# Altium PCB Stadium_Board.PcbDoc
Units mil, origin at the board's own origin, x right, y up, seen from the top; angles counter-clockwise.
Board outline 3450 x 1800 mil, 2 copper layers (Top Layer, Bottom Layer); 52 components, 36 nets, 158 pads, 57 vias.
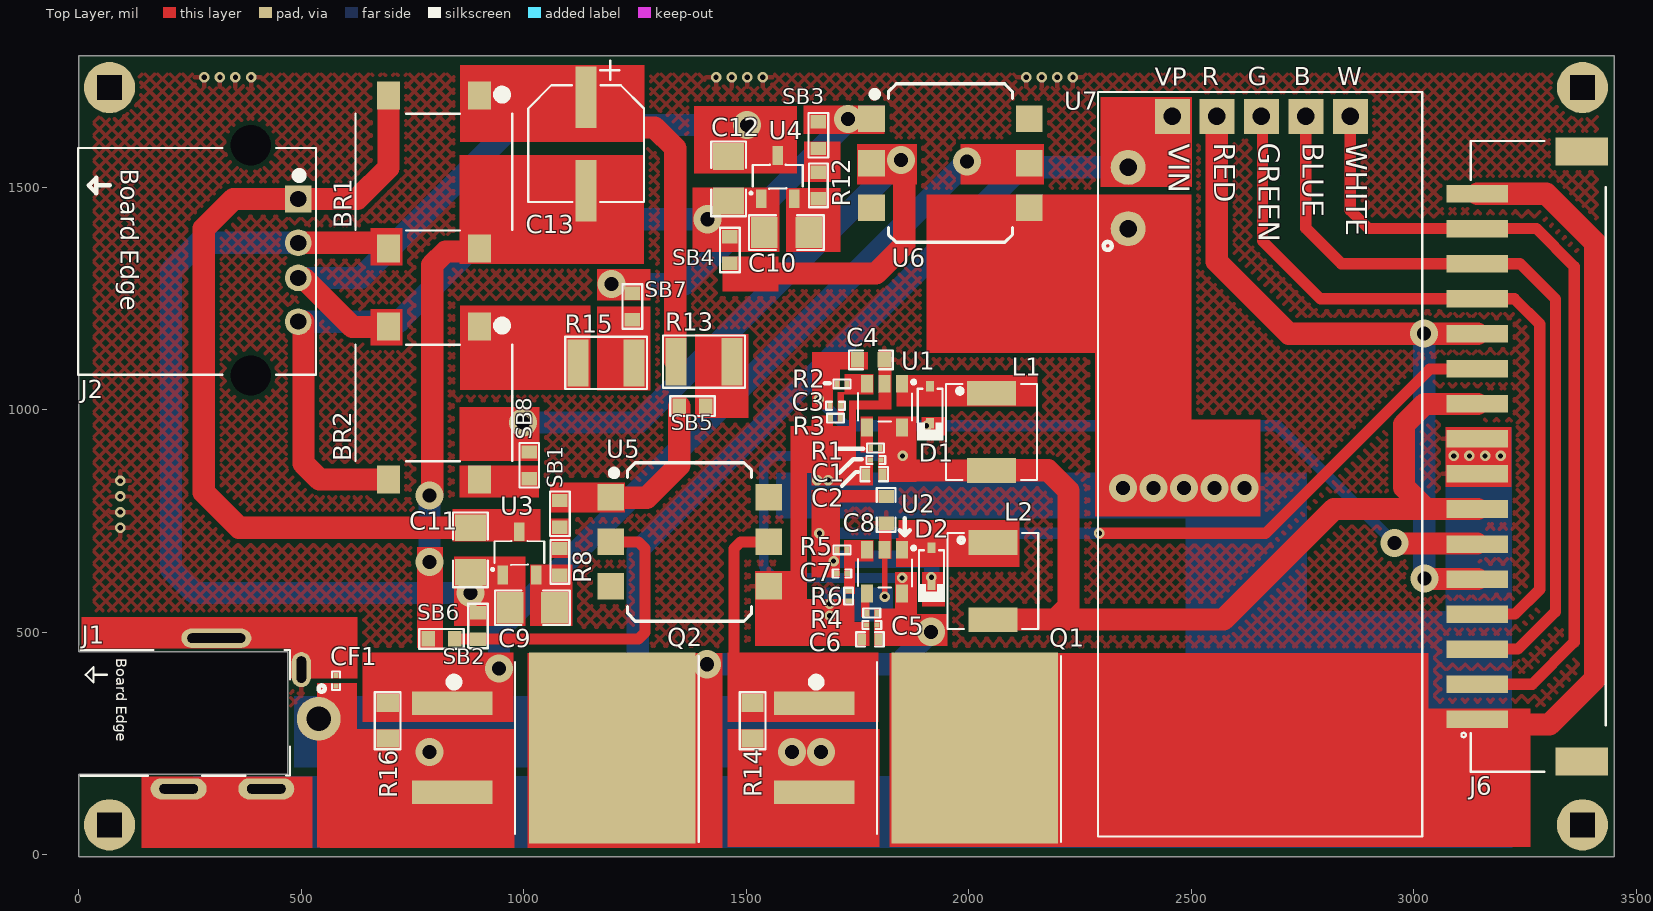
[diagram p0: Top Layer view]
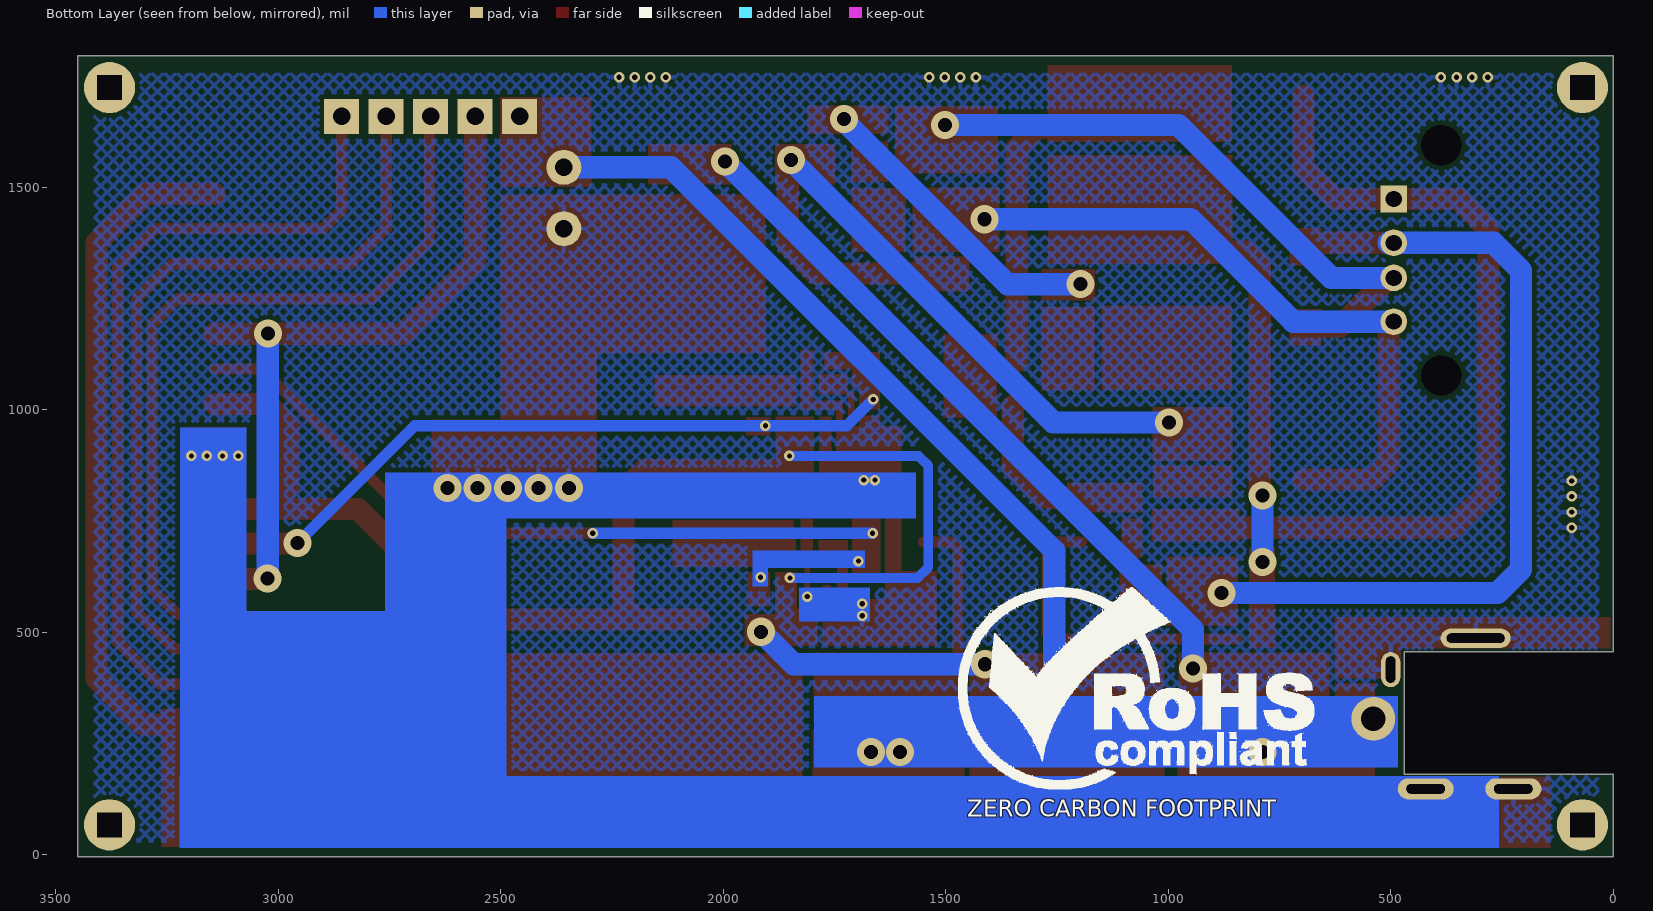
[diagram p1: Bottom Layer view, seen from below]
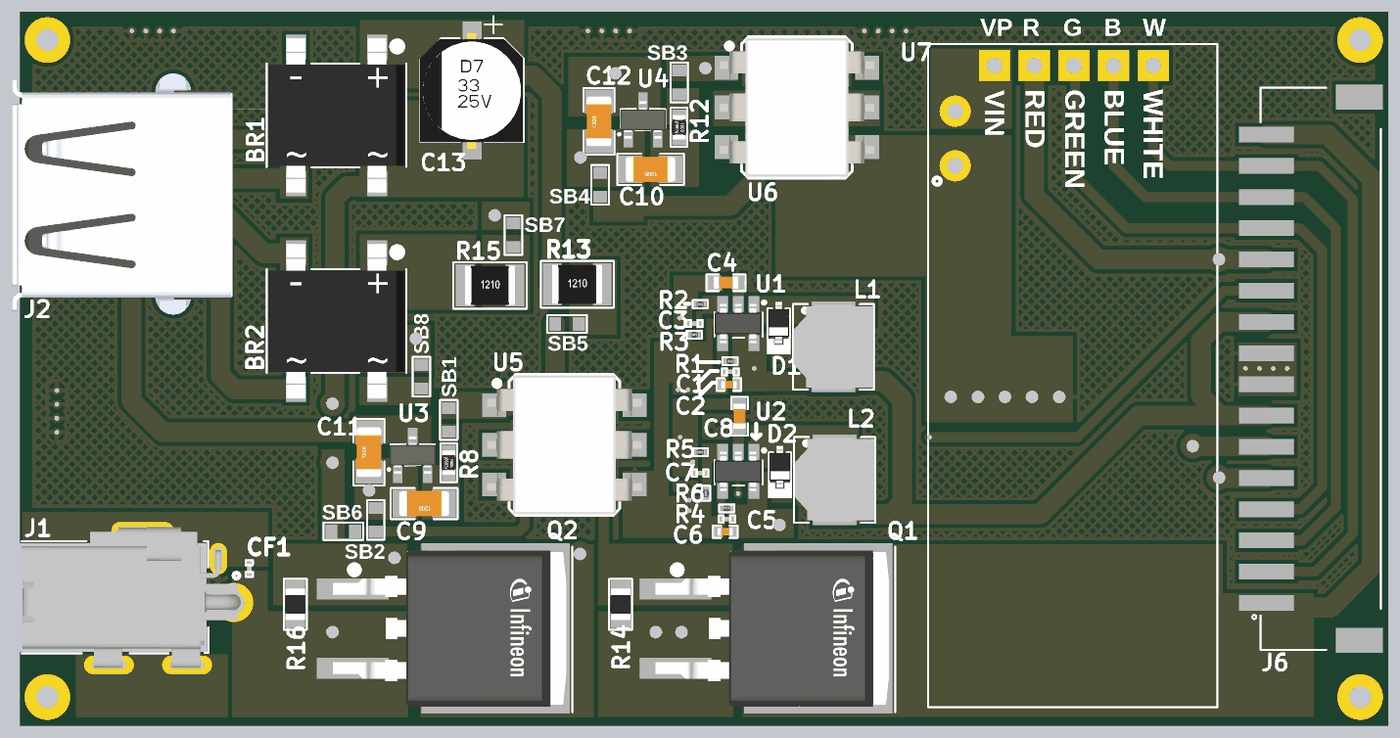
[diagram p2: 3D render of the assembled board from above, using the file's embedded part models]

## Layer stack, top to bottom
Top Solder: solder mask 0.4, Solder Resist, Dk 3.5
Top Layer: signal copper 1.4
Dielectric 1: dielectric 12.6, FR-4, Dk 4.8
Bottom Layer: signal copper 1.4
Bottom Solder: solder mask 0.4, Solder Resist, Dk 3.5

## Board outline
0,-5 0,181 470,181 470,456 0,456 0,1795 3450,1795 3450,-5

## Design rules (kind name [scope] priority, off if disabled: settings)
Clearance [All] p1: gap=10 ignorepadtopadclearanceinfootprint=FALSE except(0: Arc-Hole Track-Hole SMDPad-Hole THPad-Hole Via-Hole Fill-Hole Poly-Hole Region-Hole Text-Hole)
ComponentClearance [All] p1: gap=0 collisioncheckmode=3 verticalgap=0 showdistances=FALSE
HoleSize [All] p1: absolutevalues=TRUE maxlimit=1000 minlimit=1 maxpercent=80.000 minpercent=20.000
HoleToHoleClearance [All] p1: gap=0 allowstackedmicrovias=TRUE
MinimumSolderMaskSliver [All] p1: minsoldermaskwidth=0
PolygonConnect [All] p1: connectstyle=Relief reliefconductorwidth=10 reliefentries=4 polygonreliefangle="90 Angle" airgapwidth=10
RoutingVias [All] p1: holewidth=11.81 width=23.62 viastyle="Through Hole" minholewidth=7.87 minwidth=15.75 maxholewidth=31.5 maxwidth=62.99
SilkToSilkClearance [All] p1: silktosilkclearance=0
SilkToSolderMaskClearance [IsPad] p1: minsilkscreentomaskgap=0 clearancetoexposedcopper=TRUE
SolderMaskExpansion SolderMaskExpansion_1 [Not IsVia] p1: expansion=4 istentingtop=FALSE
SolderMaskExpansion [IsVia] p2: expansion=4 istentingtop=FALSE soldermaskfromhole=TRUE
Width [All] p1: maxlimit=50 minlimit=10 preferedwidth=12 minimp=50.000000 maximp=50.000000 favimp=50.000000
24 further rules are at their usual default settings.

## Classes and differential pairs
component class U_Rectifier_Section: BR1 BR2 C13 Q1 Q2 R13 R14 R15 R16 SB5 SB6 SB7 SB8 U5 U6
component class U_Regulator_Section: C9 C10 C11 C12 R8 R12 SB1 SB2 SB3 SB4 U3 U4
component class U_Boost_Section: C1 C2 C3 C4 C5 C6 C7 C8 D1 D2 L1 L2 R1 R2 R3 R4 R5 R6 U1 U2
component class U_Connector_Section: CF1 J1 J2 J6 U7

## Components (designator, comment, footprint, x,y, rotation, side; value= is the part's Value field where it differs from the comment)
BR1 "DF06S" DF06S 798,1534 r180 top locked
BR2 "DF06S" DF06S 798,1015 r180 top locked
C1 "0.1uF" "CAP 0201" 1791,887 r180 top locked
C2 "2.2uF" Cap0402 1787.5,855 r180 top locked
C3 "220pF" "CAP 0201" 1700,1009 r0 top locked
C4 "4.7uF" Cap0603 1780,1112 r0 top locked
C5 "0.1uF" "CAP 0201" 1782,516 r180 top locked
C6 "2.2uF" Cap0402 1778,484 r180 top locked
C7 "220pF" "CAP 0201" 1715,632 r0 top locked
C8 "4.7uF" Cap0603 1814,775 r270 top locked
C9 "1uF" Cap1206 1019,555 r180 top locked value=1206
C10 "1uF" Cap1206 1590,1398 r180 top locked value=1206
C11 "1uF" Cap1206 880,685 r90 top locked value=1206
C12 "1uF" Cap1206 1460,1519 r90 top locked value=1206
C13 "33uF" VE-330M1ETR-0605 1140,1597 r270 top locked
CF1 "0.1uF" "CAP 0201" 578,391 r90 top
D1 "SDM2U20SD3-7" SDM2U20SD3-7 1913,1011 r270 top locked
D2 "SDM2U20SD3-7" SDM2U20SD3-7 1916,648 r270 top locked
J1 "DC-C024E-7A-1.65" DC-C024E-7A-1.65 381.69,317.3 r0 top locked
J2 "292303-1" 292303-1 493,1473.43 r270 top
J6 "0220164-162121" 0220164-162121 3260,895 r90 top locked
L1 "10uH" SPM5012T-100M-LR 2051,950 r270 top locked
L2 "10uH" SPM5012T-100M-LR 2054,615 r270 top locked
Q1 "IPB120P04P4L03ATMA2" IPB120P04P4L03ATMA2 1832.88,240 r270 top locked
Q2 "IPB120P04P4L03ATMA2" IPB120P04P4L03ATMA2 1018.88,240 r270 top locked
R1 "51K" Res-0201 1790.17,914 r180 top locked
R2 "715K" Res-0201 1715,1058 r180 top locked
R3 "13K" Res-0201 1700.17,981 r180 top locked
R4 "51K" Res-0201 1782,543 r180 top locked
R5 "715K" Res-0201 1715,685 r180 top locked
R6 "13K" Res-0201 1730,581 r270 top locked
R8 "220R" Res0603 1081,658 r90 top locked
R12 "220R" Res0603 1662,1504 r90 top locked
R13 "560R" "RES 1210" 1405,1108 r0 top locked
R14 "10K" "RES 0805" 1514,301 r90 top locked value=10kO
R15 "560R" "RES 1210" 1185,1105 r0 top locked
R16 "10K" "RES 0805" 694,301 r90 top locked value=10kO
SB1 "Solder Bridge" "Solder Bridge" 1081,766 r90 top locked
SB2 "Solder Bridge" "Solder Bridge" 897,514 r270 top locked
SB3 "Solder Bridge" "Solder Bridge" 1662,1617 r90 top locked
SB4 "Solder Bridge" "Solder Bridge" 1463,1359 r270 top locked
SB5 "Solder Bridge" "Solder Bridge" 1379,1008 r180 top locked
SB6 "Solder Bridge" "Solder Bridge" 815,485 r0 top locked
SB7 "Solder Bridge" "Solder Bridge" 1244,1232 r90 top locked
SB8 "Solder Bridge" "Solder Bridge" 1012,875 r90 top locked
U1 "LMR62014XMF/NOPB" SOT23-5 1811,1009 r270 top locked
U2 "LMR62014XMF/NOPB" SOT23-5 1811,636 r270 top locked
U3 "SE8633X2-HF" SOT23-3 990,675 r90 top locked
U4 "SE8633X2-HF" SOT23-3 1570.6,1520.62 r90 top locked
U5 "4N25SM" 4N25/35M 1372.64,703 r0 top locked
U6 "4N25SM" 4N25/35M 1958.64,1554 r0 top locked
U7 "ESP8285" ESP8285 2857.21,1659.17 r180 top locked

## Footprints (in the part's own frame and the unit in brackets; to place one, negate y for a bottom-side part, rotate by r counter-clockwise, add the part's x,y. Pads: shape width x height; smd on the part's side, far side on the other; paste and mask are expansions set on the pad)
4N25/35M [mm] "OPTOISO 4.17KV TRANS W/BASE 6SMD"
  rect 1.52x1.525 smd: 1(-4.505,2.54) 2(-4.505,0) 3(-4.505,-2.54) 4(4.505,-2.54) 5(4.505,0) 6(4.505,2.54)
  silkscreen extent -4.42,-4.52 3.54,4.52, body extent -4.95,-4.44 4.95,4.44, height 5.08
0220164-162121 [mm]
  rect 1x3.5 smd: 1(-15,2.975) 2(-13,2.975) 3(-11,2.975) 4(-9,2.975) 5(-7,2.975) 6(-5,2.975) 7(-3,2.975) 8(-1,2.975) 9(1,2.975) 10(3,2.975) 11(5,2.975) 12(7,2.975) 13(9,2.975) 14(11,2.975) 15(13,2.975) 16(15,2.975)
  rect 1.6x3 smd: MP1(-17.4,-2.975) MP2(17.4,-2.975)
  silkscreen extent -18,-4.35 18,3.89
292303-1 [mm] "USB-A (USB TYPE-A) USB 2.0 Receptacle Connector 4 Position Through Hole, Right Angle"
  rect 1.524x1.524 hole 0.92: 1(0,0)
  round 1.524 hole 0.92: 2(2.5,0) 3(4.5,0) 4(7,0)
  round 0 hole 2.3 unplated: MH1(-3.07,-2.71) MH2(10.07,-2.71)
  silkscreen extent -2.92,-12.57 10.03,1.02, body extent -4.44,-13.02 11.56,0.98, height 7.71
Cap0402 [mil]
  rect 18x25 smd mask+2.36: 1(-18.5,0) 2(18.5,0)
  silkscreen extent -31,-16 31,16, body extent -20,-10 20,10, height 19
Cap0603 [mil]
  rect 30x35 smd mask+2.36: 1(-30,0) 2(30,0)
  silkscreen extent -49,-21 49,21, body extent -32,-16 31,16, height 34
Cap1206 [mil] "SMD 1206"
  rect 60x70 smd: 1(-50,0) 2(50,0)
  silkscreen extent -84,-39 84,39, body extent -63,-31 63,32, height 39
"CAP 0201" [mm]
  rect 0.3x0.3 smd mask+0.055: 1(-0.3,0) 2(0.3,0)
  silkscreen extent -0.53,-0.23 0.53,0.23, body extent -0.3,-0.15 0.3,0.15, height 0.28
DC-C024E-7A-1.65 [mm]
  round 2.5 hole 1.4: 1(3.995,-0.3)
  oval 4x1.1 hole 0.55 slot 3.3 at 0 deg: 2(-1.845,4.3)
  oval 1.1x2 hole 0.55 slot 1.5 at 90 deg: 3(3.005,2.507)
  oval 3.2x1.2 hole 0.55 slot 2.2 at 0 deg: 4(-3.995,-4.3) 5(1.005,-4.3)
  silkscreen extent -9.6,-3.56 4.35,3.63, body extent -9.57,-4.48 4.43,4.52, height 5.05
DF06S [mm]
  rect 1.3x1.6 smd: 1(-2.6,-4.37) 2(-2.6,4.37) 3(2.6,-4.37) 4(2.6,4.37)
  silkscreen extent -4.47,-4.68 4.47,3.33, body extent -4.4,-4.98 4.4,4.99, height 3.02
ESP8285 [mm]
  round 2 hole 1: 1(12.68,6.41) 2(12.68,2.91)
  rect 2x2 hole 1: 3(10.16,0) 4(7.62,0) 5(5.08,0) 6(2.54,0) 7(0,0)
  silkscreen extent -4.1,-1.4 14.4,41.1
IPB120P04P4L03ATMA2 [mm] "MOSFET P-CH 40V 120A TO263-3"
  rect 1.35x4.6 smd: 1(-2.54,-4.575) 3(2.54,-4.575)
  rect 10.9x9.5 smd: 2_4(0,4.575)
  silkscreen extent -5.23,-4.7 5.36,9.5, body extent -5,-5.85 5,9.1, height 4.51
Res0603 [mil]
  rect 30x35 smd: 1(-30,0) 2(30,0)
  silkscreen extent -49,-21 49,21, body extent -31,-17 31,17, height 18
"RES 0805" [mil] "SMD 0805"
  rect 40x50 smd: 1(-40,0) 2(40,0)
  silkscreen extent -64,-29 64,29, body extent -39,-25 39,24, height 24
"RES 1210" [mm] "560 OHM"
  rect 1.2x2.7 smd: 1(-1.6,0) 2(1.6,0)
  silkscreen extent -2.34,-1.49 2.34,1.49, body extent -1.6,-1.25 1.6,1.25, height 0.6
Res-0201 [mm]
  rect 0.27x0.37 smd: 1(-0.275,0) 2(0.275,0)
  silkscreen extent -0.48,-0.25 0.48,0.25, body extent -0.3,-0.15 0.3,0.15, height 0.29
SDM2U20SD3-7 [mm]
  rect 0.59x0.45 smd: 1(-1.055,0) 2(1.055,0)
  silkscreen extent -0.91,-0.76 2.03,0.76, body extent -1.3,-0.68 1.3,0.67, height 1.1
"Solder Bridge" [mil] "Solder Bridge ON"
  rect 30x35 smd: 1(-30,0) 2(30,0)
  silkscreen extent -50,-22 50,22
SOT23-3 [mm]
  rect 1.07x0.6 smd: 1(-1.184,0.95) 2(-1.184,-0.95) 3(1.286,0)
  silkscreen extent -0.94,-1.42 0.76,1.6, body extent -1.15,-1.46 1.25,1.46, height 1.19
SOT23-5 [mil] "SOT23-5 Package"
  rect 40x27 smd: 1(-49.21,39.37) 2(-49.21,0) 3(-49.21,-39.37) 4(49.21,-39.37) 5(49.21,39.37)
  silkscreen extent -56,-60 36,68, body extent -49,-59 49,59, height 43
SPM5012T-100M-LR [mm]
  rect 1.4x2.8 smd: 1(-2.2,0) 2(2.2,0)
  silkscreen extent -2.74,-2.59 2.74,2.59, body extent -2.7,-2.55 2.7,2.55, height 1.16
VE-330M1ETR-0605 [mm]
  rect 3.5x1.2 smd: 1(-2.67,0) 2(2.67,0)
  silkscreen extent -4.75,-3.3 3.3,3.3, body extent -3.67,-3.33 3.73,3.27, height 5.25

## Part data
BR1 BR2: "BRIDGE RECT 1PHASE 600V 1A DF-S", Average Rectified Current=1.5A, Capacitance=1nF, Case/Package=SMD/SMT, Case Code (Imperial)=0603, Case Code (Metric)=1608, Forward Voltage=1.1V, Manufacturer="ON Semiconductor / Fairchild", Max Forward Surge Current (Ifsm)=50A, Max Operating Temperature=150°C, Max Power Dissipation=3.1W, Max Repetitive Reverse Voltage (Vrrm)=600V, Max Reverse Leakage Current=50uA, Min Operating Temperature=-55°C, Package Quantity=10000, Peak Reverse Current=5uA, Supplier Part Number 1=DF06SCT-ND, Tolerance=5%, Voltage Rating=100V, ComponentLink1Description=http://www.farnell.com/datasheets/2161293.pdf?src-supplier=Element14, ComponentLink1URL=http://www.farnell.com/datasheets/2161293.pdf?src-supplier=Element14, ComponentLink2Description=https://www.fairchildsemi.com/datasheets/DF/DF08S.pdf?src-supplier=Avnet, ComponentLink2URL=https://www.fairchildsemi.com/datasheets/DF/DF08S.pdf?src-supplier=Avnet, ComponentLink3Description=http://www.fairchildsemi.com/ds/DF/DF08S.pdf?src-supplier=Avnet+Europe, ComponentLink3URL=http://www.fairchildsemi.com/ds/DF/DF08S.pdf?src-supplier=Avnet+Europe, ComponentLink4Description=http://www.fairchildsemi.com/ds/DF/DF06S.pdf?src-supplier=Future+Electronics, ComponentLink4URL=http://www.fairchildsemi.com/ds/DF/DF06S.pdf?src-supplier=Future+Electronics, ComponentLink5Description=https://www.fairchildsemi.com/datasheets/DF/DF005S.pdf?src-supplier=Digi-Key, ComponentLink5URL=https://www.fairchildsemi.com/datasheets/DF/DF005S.pdf?src-supplier=Digi-Key, ComponentLink6Description=http://www.mouser.com/ds/2/149/DF06S-190284.pdf?src-supplier=Mouser, ComponentLink6URL=http://www.mouser.com/ds/2/149/DF06S-190284.pdf?src-supplier=Mouser, ComponentLink7Description=http://datasheet.iiic.cc/fairchild/DF06S.pdf?src-supplier=IIIC, ComponentLink7URL=http://datasheet.iiic.cc/fairchild/DF06S.pdf?src-supplier=IIIC, Current Rating=1.5A, Element Configuration=Single, Forward Current=1.5A, Height=3.3mm, Lead Free="Lead Free", Length=0.063inch, Manufacturer Part Number=DF06S, Max Surge Current=50A, Mount="Through Hole", Number of Elements=1, Number of Pins=4, Output Current=1.5A, Packaging="Tape and Reel", Peak Non-Repetitive Surge Current=50A, Power Dissipation=3.1W, Pricing 1="1=0.5, 10=0.425, 25=0.3964, 100=0.2946, 500=0.23 (USD)", Radiation Hardening=No, REACH SVHC="No SVHC", Stock 1=3050, Supplier 1=Digi-Key, Termination=SMD/SMT, Thickness=0.035inch, Voltage Rating (DC)=600V, Weight=0.484g, Width=6.5mm
C1 C5: library part GRM033R61E104KE14D, "CAP CER 0.1UF 25V X5R 0201", Capacitance=100nF, Case/Package=0201, Case Code (Metric)=0603, Dielectric=X5R, Manufacturer=Murata, Max Operating Temperature=85°C, Min Operating Temperature=-55°C, Package Quantity=15000, Resistor Type=Ceramic, Supplier Part Number 1=81-GRM033R61E104KE4D, Tolerance=10%, Voltage Rating=25V, Case Code (Imperial)=0201, Category="Ceramic Capacitors", ComponentLink1Description=http://www.farnell.com/datasheets/2867843.pdf?src-supplier=Farnell, ComponentLink1URL=http://www.farnell.com/datasheets/2867843.pdf?src-supplier=Farnell, ComponentLink2Description=http://www.mouser.com/ds/2/281/c02e-2905.pdf?src-supplier=Mouser, ComponentLink2URL=http://www.mouser.com/ds/2/281/c02e-2905.pdf?src-supplier=Mouser, ComponentLink3Description=http://search.murata.co.jp/Ceramy/image/img/A01X/G101/ENG/GRM033R61E104KE14-01.pdf?src-supplier=Digi-Key, ComponentLink3URL=http://search.murata.co.jp/Ceramy/image/img/A01X/G101/ENG/GRM033R61E104KE14-01.pdf?src-supplier=Digi-Key, ComponentLink4Description=http://www.farnell.com/datasheets/2867843.pdf?src-supplier=Newark, ComponentLink4URL=http://www.farnell.com/datasheets/2867843.pdf?src-supplier=Newark, Height=0.3mm, Lead Free="Lead Free", Length=0.024inch, Manufacturer Part Number=GRM033R61E104KE14D, Mount="Surface Mount", Packaging="Tape and Reel", Pricing 1="1=0.12000, 10=0.05600, 50=0.05600, 100=0.02500, 1000=0.01400, 10000=0.01100 (USD)", RoHS=Yes, RoHS Compliant=Yes, Stock 1=19728, Supplier 1=Mouser, Termination=SMD/SMT, Thickness=0.013inch, Voltage Rating (DC)=25V, Weight=1.2E-05oz, Width=0.012inch
C2 C6: library part C1005X5R1E225KT000E, "CAP CER 2.2UF 25V X5R 0402", Case/Package=0402, Case Code (Metric)=1005, Dielectric=X5R, Dielectric Material=Ceramic, Manufacturer=TDK, Manufacturer Part Number=C1005X5R1E225K050BC, Max Operating Temperature=85°C, Min Operating Temperature=-55°C, Package Quantity=1, Supplier Part Number 1=445-9090-1-ND, Tolerance=10%, Voltage Rating=25V, Capacitance=2.2uF, Case Code (Imperial)=0402, Category="Ceramic Capacitors", ComponentLink1Description=https://datasheet.ciiva.com/24217/c1005x5r1e225k050bc-264404-24217075.pdf?src-supplier=Mouser, ComponentLink1URL=https://datasheet.ciiva.com/24217/c1005x5r1e225k050bc-264404-24217075.pdf?src-supplier=Mouser, ComponentLink2Description=https://datasheet.ciiva.com/6276/tdkmlcccaprange-6276808.pdf?src-supplier=Digi-Key, ComponentLink2URL=https://datasheet.ciiva.com/6276/tdkmlcccaprange-6276808.pdf?src-supplier=Digi-Key, ComponentLink3Description=https://datasheet.ciiva.com/6276/tdkmlcccaprange-6276806.pdf?src-supplier=Digi-Key, ComponentLink3URL=https://datasheet.ciiva.com/6276/tdkmlcccaprange-6276806.pdf?src-supplier=Digi-Key, ComponentLink4Description=https://datasheet.ciiva.com/6276/tdkmlcccaprange-6276810.pdf?src-supplier=Digi-Key, ComponentLink4URL=https://datasheet.ciiva.com/6276/tdkmlcccaprange-6276810.pdf?src-supplier=Digi-Key, Depth=0.5mm, Height=0.5mm, Lead Free="Lead Free", Length=1mm, Mount="Surface Mount", Packaging="Tape and Reel", Pricing 1="1=0.31000, 10=0.21000, 50=0.13980, 100=0.11890, 500=0.08390, 1000=0.07342, 2500=0.06992, 5000=0.06468 (USD)", REACH SVHC="No SVHC", Resistor Type=Ceramic, RoHS=Yes, RoHS Compliant=Yes, Series=C, Stock 1=655450, Supplier 1=Digi-Key, Termination=SMD/SMT, Thickness=0.022inch, Voltage Rating (DC)=25V, Weight=2.3E-05oz, Width=0.5mm
C3 C7: library part C0603X7R221KGT, "50V 220pF X7R ±10% 0201 Multilayer Ceramic Capacitors MLCC - SMD/SMT ROHS", Manufacturer="Darfon Elec", ComponentLink1Description="New link", ComponentLink1URL=https://www.lcsc.com/product-detail/Multilayer-Ceramic-Capacitors-MLCC-SMD-SMT_Darfon-Elec-C0603X7R221KGT_C258475.html, Manufacturer Part No=C0603X7R221KGT
C4 C8: library part C1608X5R1E475K080AC, "CAP CER 4.7UF 25V X5R 0603", Case/Package=0603, Case Code (Metric)=1608, Dielectric=X5R, Dielectric Material=Ceramic, Manufacturer=TDK, Max Operating Temperature=85°C, Min Operating Temperature=-55°C, Package Quantity=4000, Supplier Part Number 1=445-9050-1-ND, Tolerance=10%, Voltage Rating=25V, Capacitance=4.7uF, Case Code (Imperial)=0603, Category="Ceramic Capacitors", ComponentLink1Description=https://datasheet.ciiva.com/48587/6print-detail-pdf-phplangenpart-noc1608x5r1e475k080acimp-unit-xmhz-48587141.pdf?src-supplier=Onlinecomponents.com, ComponentLink1URL=https://datasheet.ciiva.com/48587/6print-detail-pdf-phplangenpart-noc1608x5r1e475k080acimp-unit-xmhz-48587141.pdf?src-supplier=Onlinecomponents.com, ComponentLink2Description=https://datasheet.ciiva.com/24216/mlcc-commercial-general-en-24216326.pdf?src-supplier=Mouser, ComponentLink2URL=https://datasheet.ciiva.com/24216/mlcc-commercial-general-en-24216326.pdf?src-supplier=Mouser, ComponentLink3Description=https://datasheet.ciiva.com/48671/mlcc-commercial-general-en-48671304.pdf?src-supplier=Avnet, ComponentLink3URL=https://datasheet.ciiva.com/48671/mlcc-commercial-general-en-48671304.pdf?src-supplier=Avnet, Depth=0.8mm, Height=0.8mm, Lead Free="Lead Free", Length=1.6mm, Manufacturer Part Number=C1608X5R1E475K080AC, Mount="Surface Mount", Packaging="Tape and Reel", Pricing 1="1=0.36000, 10=0.25000, 50=0.17460, 100=0.14970, 500=0.11230, 1000=0.09483 (USD)", REACH SVHC="No SVHC", Resistor Type=Ceramic, RoHS=Yes, Stock 1=495198, Supplier 1=Digi-Key, Termination=SMD/SMT, Thickness=0.039inch, Voltage Rating (DC)=25V, Weight=7.1E-05oz, Width=0.031inch
C9 C10 C11 C12: library part CL31B105KCHNNNE, "CAP CER 1UF 100V X7R 1206", Manufacturer="Samsung Electro-Mechanics", Package=1206, ComponentLink1Description="New link", ComponentLink1URL=https://lcsc.com/product-detail/Multilayer-Ceramic-Capacitors-MLCC-SMD-SMT_Samsung-Electro-Mechanics-CL31B105KCHNNNE_C13832.html, Manufacturer Part No=CL31B105KCHNNNE
C13: library part VE-330M1ETR-0605, "Aluminum Electrolytic Capacitors - SMD 25 Volts 33uF 20% 6.3x5.3", Case/Package=Aluminum, Leakage Current=3uA, Manufacturer=Lelon, Max Operating Temperature=85°C, Min Operating Temperature=-40°C, Package Quantity=1000, Ripple Current=67mA, Supplier Part Number 1=VE330M1ETR0605, Tolerance=20%, Voltage Rating=25V, Capacitance=33uF, Category="Aluminum Electrolytic Capacitors", ComponentLink1Description=https://www.verical.com/server-webapp/html/getDatasheet?partID=686789&src-supplier=Verical, ComponentLink1URL=https://www.verical.com/server-webapp/html/getDatasheet?partID=686789&src-supplier=Verical, ComponentLink2Description=http://components.arrow.com/part/dataview/0323_04207400?src-supplier=Arrow+Europe, ComponentLink2URL=http://components.arrow.com/part/dataview/0323_04207400?src-supplier=Arrow+Europe, ComponentLink3Description=http://www.lelon.com.tw/down.php?f=/file/7.pdf&n=VE.pdf&src-supplier=Mouser, ComponentLink3URL=http://www.lelon.com.tw/down.php?f=/file/7.pdf&n=VE.pdf&src-supplier=Mouser, Construction=Cylindrical, Dissipation Factor=0.14%, Height=6.6mm, Length=5.3mm, Life (Hours)=2000Hour, Manufacturer Part Number=VE-330M1ETR-0605, Packaging="Tape and Reel", Pricing 1="1000=0.14450, 2000=0.13080, 4000=0.10990, 5000=0.10190, 10000=0.09820, 25000=0.09440 (USD)", Radiation Hardening=No, RoHS=Yes, RoHS Compliant=Yes, Series=VE, Stock 1=3000, Supplier 1="Arrow Electronics", Termination=SMD/SMT, Voltage Rating (DC)=25V
CF1: library part GRM033R61E104KE14D, "CAP CER 0.1UF 25V X5R 0201", Capacitance=100nF, Case Code (Imperial)=0201, Case Code (Metric)=0603, Dielectric=X5R, Manufacturer=Murata, Max Operating Temperature=85°C, Min Operating Temperature=-55°C, Package Quantity=15000, Resistor Type=Ceramic, Supplier Part Number 1=81-GRM033R61E104KE4D, Tolerance=10%, Voltage Rating=25V, Case/Package=0201, Category="Ceramic Capacitors", ComponentLink1Description=http://www.farnell.com/datasheets/2867843.pdf?src-supplier=Farnell, ComponentLink1URL=http://www.farnell.com/datasheets/2867843.pdf?src-supplier=Farnell, ComponentLink2Description=http://www.mouser.com/ds/2/281/c02e-2905.pdf?src-supplier=Mouser, ComponentLink2URL=http://www.mouser.com/ds/2/281/c02e-2905.pdf?src-supplier=Mouser, ComponentLink3Description=http://search.murata.co.jp/Ceramy/image/img/A01X/G101/ENG/GRM033R61E104KE14-01.pdf?src-supplier=Digi-Key, ComponentLink3URL=http://search.murata.co.jp/Ceramy/image/img/A01X/G101/ENG/GRM033R61E104KE14-01.pdf?src-supplier=Digi-Key, ComponentLink4Description=http://www.farnell.com/datasheets/2867843.pdf?src-supplier=Newark, ComponentLink4URL=http://www.farnell.com/datasheets/2867843.pdf?src-supplier=Newark, Height=0.3mm, Lead Free="Lead Free", Length=0.024inch, Manufacturer Part Number=GRM033R61E104KE14D, Mount="Surface Mount", Packaging="Tape and Reel", Pricing 1="1=0.12000, 10=0.05600, 50=0.05600, 100=0.02500, 1000=0.01400, 10000=0.01100 (USD)", RoHS=Yes, RoHS Compliant=Yes, Stock 1=19728, Supplier 1=Mouser, Termination=SMD/SMT, Thickness=0.013inch, Voltage Rating (DC)=25V, Weight=1.2E-05oz, Width=0.012inch
D1 D2: "DIODE SCHOTTKY 20V 2A SOD323", Average Rectified Current=2A, Manufacturer=Diodes, Max Reverse Voltage (DC)=20V, Supplier Part Number 1=SDM2U20SD3-7DICT-ND, Category="Rectifier Diodes", ComponentLink1Description=http://www.mouser.com/ds/2/115/SDM2U20SD3-537776.pdf?src-supplier=Mouser, ComponentLink1URL=http://www.mouser.com/ds/2/115/SDM2U20SD3-537776.pdf?src-supplier=Mouser, ComponentLink2Description=https://www.diodes.com/assets/Datasheets/SDM2U20SD3.pdf?src-supplier=Digi-Key, ComponentLink2URL=https://www.diodes.com/assets/Datasheets/SDM2U20SD3.pdf?src-supplier=Digi-Key, ComponentLink3Description=http://diodes.com/datasheets/SDM2U20SD3.pdf?src-supplier=Avnet, ComponentLink3URL=http://diodes.com/datasheets/SDM2U20SD3.pdf?src-supplier=Avnet, Manufacturer Part Number=SDM2U20SD3-7, Mount="Surface Mount", Packaging="Cut Tape", Pricing 1="1=0.47000, 10=0.35200, 100=0.19930, 500=0.13200, 1000=0.10120 (USD)", RoHS=Yes, RoHS Compliant=Yes, Stock 1=6, Supplier 1=Digi-Key
J1: "DC Power Receptacle 1.65mm 4.3mm 7A 24V Plugin AC/DC Power Connectors ROHS", Package=Custom, Manfacturer="XKB Connectivity", Maunfacturer Part No=DC-C024E-7A-1.65
J2: "USB-A (USB TYPE-A) USB 2.0 Receptacle Connector 4 Position Through Hole, Right Angle", Color=Black, Contact Current Rating=1A, Flammability Rating="UL94 V-0", Insulation Resistance=1GR, Manufacturer="TE Connectivity", Max Operating Temperature=185°C, Min Operating Temperature=-67°C, Package Quantity=30, Supplier Part Number 1=A31726-ND, Voltage Rating (AC)=30V, Approvals=UL, Circuit Application=Signal, ComponentLink1Description=http://www.farnell.com/datasheets/1699414.pdf?src-supplier=Farnell, ComponentLink1URL=http://www.farnell.com/datasheets/1699414.pdf?src-supplier=Farnell, ComponentLink2Description=http://www.te.com/commerce/DocumentDelivery/DDEController?Action=showdoc&DocId=Data+Sheet%7F1-1773453-6%7F0908%7Fpdf%7FEnglish%7FENG_DS_1-1773453-6_0908.pdf&src-supplier=Avnet, ComponentLink2URL=http://www.te.com/commerce/DocumentDelivery/DDEController?Action=showdoc&DocId=Data+Sheet%7F1-1773453-6%7F0908%7Fpdf%7FEnglish%7FENG_DS_1-1773453-6_0908.pdf&src-supplier=Avnet, ComponentLink3Description=http://www.te.com/commerce/DocumentDelivery/DDEController?Action=showdoc&DocId=Data+Sheet1-1773453-60908pdfEnglishENG_DS_1-1773453-6_0908.pdf&src-supplier=Avnet+Asia, ComponentLink3URL=http://www.te.com/commerce/DocumentDelivery/DDEController?Action=showdoc&DocId=Data+Sheet1-1773453-60908pdfEnglishENG_DS_1-1773453-6_0908.pdf&src-supplier=Avnet+Asia, ComponentLink4Description=https://www.te.com/commerce/DocumentDelivery/DDEController?Action=srchrtrv&DocNm=292303&DocType=Customer+Drawing&DocLang=English&src-supplier=Digi-Key, ComponentLink4URL=https://www.te.com/commerce/DocumentDelivery/DDEController?Action=srchrtrv&DocNm=292303&DocType=Customer+Drawing&DocLang=English&src-supplier=Digi-Key, ComponentLink5Description=http://www.farnell.com/datasheets/1699414.pdf?src-supplier=Element14, ComponentLink5URL=http://www.farnell.com/datasheets/1699414.pdf?src-supplier=Element14, ComponentLink6Description=http://www.farnell.com/cad/1699210.pdf?src-supplier=Element14, ComponentLink6URL=http://www.farnell.com/cad/1699210.pdf?src-supplier=Element14, ComponentLink7Description=https://www.alliedelec.com/m/d/b8ff6cd1157c72c7c4c41b4704d2a2e6.pdf?src-supplier=Allied+Electronics, ComponentLink7URL=https://www.alliedelec.com/m/d/b8ff6cd1157c72c7c4c41b4704d2a2e6.pdf?src-supplier=Allied+Electronics, ComponentLink8Description=http://www.te.com/commerce/DocumentDelivery/DDEController?Action=showdoc&DocId=Data+Sheet%7F1-1773453-6%7F0908%7Fpdf%7FEnglish%7FENG_DS_1-1773453-6_0908.pdf&src-supplier=Avnet+Europe, ComponentLink8URL=http://www.te.com/commerce/DocumentDelivery/DDEController?Action=showdoc&DocId=Data+Sheet%7F1-1773453-6%7F0908%7Fpdf%7FEnglish%7FENG_DS_1-1773453-6_0908.pdf&src-supplier=Avnet+Europe, ComponentLink9Description=https://www.distrelec.biz/Web/Downloads/07/08/04270708.pdf?mime=application%2Fpdf&src-supplier=Distrelec, ComponentLink9URL=https://www.distrelec.biz/Web/Downloads/07/08/04270708.pdf?mime=application%2Fpdf&src-supplier=Distrelec, ComponentLink10Description=http://www.jameco.com/Jameco/Products/ProdDS/921651.pdf?src-supplier=Jameco, ComponentLink10URL=http://www.jameco.com/Jameco/Products/ProdDS/921651.pdf?src-supplier=Jameco, ComponentLink11Description=http://www.onlinecomponents.com/productFiles/mf-AMP/ddecontrolleractionsrchrtrvdocnm117734536doctypedsdoclan.pdf?src-supplier=Onlinecomponents.com, ComponentLink11URL=http://www.onlinecomponents.com/productFiles/mf-AMP/ddecontrolleractionsrchrtrvdocnm117734536doctypedsdoclan.pdf?src-supplier=Onlinecomponents.com, ComponentLink12Description=http://www.te.com/commerce/DocumentDelivery/DDEController?Action=showdoc&DocId=Customer+Drawing%7F292303%7FE7%7Fpdf%7FEnglish%7FENG_CD_292303_E7.pdf%7F292303-1&src-supplier=Future+Electronics, ComponentLink12URL=http://www.te.com/commerce/DocumentDelivery/DDEController?Action=showdoc&DocId=Customer+Drawing%7F292303%7FE7%7Fpdf%7FEnglish%7FENG_CD_292303_E7.pdf%7F292303-1&src-supplier=Future+Electronics, Connector System=Cable-to-Board, Connector Type=Receptacle, Contact Material="Copper Alloy,Copper", Contact Plating=Gold, Current Rating=1A, Depth=14mm, Gender=Receptacle, Halogen Free="Halogen Free", Housing Color=Black, Housing Material=Thermoplastic, Length=14.63mm, Manufacturer Part Number=292303-1, Mount="Through Hole,Horizontal", Number of Contacts=4, Number of Ports=1, Number of Positions=4, Number of Terminals=4, Orientation="Right Angle", Packaging=Rail/Tube, PCB Thickness=0.062inch, Pitch=2.5mm, Plating=Bright,Tin, Plating Thickness=0.76um, Pricing 1="1=1.49, 10=1.354, 25=1.2716, 50=1.2162, 100=1.161, 250=1.0504, 500=0.96748, 1000=0.82926, 2500=0.77398 (USD)", REACH SVHC="No SVHC", Stock 1=19088, Supplier 1=Digi-Key, Tail Length=0.112inch, Termination="Through Hole", USB Standard="USB 2.0"
J6: "16 Pin Right angle JST Conn 2 mm Pitch", ComponentLink1Description=Datasheet, ComponentLink1URL=http://www.kaweei.com/indexdata/pic/2017072520595473499.pdf
L1 L2: library part SPM5012T-100M-LR, "FIXED IND 10UH 1.3A 390.5MOHM SM", Case/Package=Nonstandard, Current Rating=1.3A, DC Resistance (DCR)=390.5mR, Manufacturer=TDK, Max Operating Temperature=125°C, Min Operating Temperature=-40°C, Resistor Type=Wirewound, Saturation Current=2.2A, Supplier Part Number 1=445-174487-1-ND, Test Frequency=100kHz, Tolerance=20%, Category="Fixed Inductors", ComponentLink1Description=https://product.tdk.com/info/en/catalog/datasheets/inductor_commercial_power_spm5012-lr_en.pdf?src-supplier=Digi-Key, ComponentLink1URL=https://product.tdk.com/info/en/catalog/datasheets/inductor_commercial_power_spm5012-lr_en.pdf?src-supplier=Digi-Key, Core Material=Metal, Height - Seated (Max)=0.047inch, Inductance=10uH, Length=0.126inch, Manufacturer Part Number=SPM5012T-100M-LR, Mount="Surface Mount", Packaging="Tape and Reel", Pricing 1="1=1.50000, 10=1.39400, 25=1.28720, 50=1.07240, 100=1.00820, 250=0.90088, 500=0.77220 (USD)", RoHS=Yes, RoHS Compliant=Yes, Shielding=Shielded, Stock 1=765, Supplier 1=Digi-Key, Width=0.118inch
Q1 Q2: "MOSFET P-CH 40V 120A TO263-3", Case/Package=TO-263-3, Continuous Drain Current (ID)=120A, Drain to Source Breakdown Voltage=-40V, Drain to Source Resistance=3.1mR, Gate to Source Voltage (Vgs)=16V, Input Capacitance=11.38nF, Manufacturer=Infineon, Manufacturer Part Number=IPB120P04P4L-03, Max Operating Temperature=175°C, Max Power Dissipation=136W, Min Operating Temperature=-55°C, Supplier Part Number 1=448-IPB120P04P4L03ATMA2DKR-ND, Category=MOSFETs, ComponentLink1Description=http://www.infineon.com/dgdl/Infineon-IPP_B_I120P04P4L_03-DS-v01_00-en.pdf?fileId=db3a30432f69f146012f783b3b5a2e3f&ack=t&src-supplier=Avnet, ComponentLink1URL=http://www.infineon.com/dgdl/Infineon-IPP_B_I120P04P4L_03-DS-v01_00-en.pdf?fileId=db3a30432f69f146012f783b3b5a2e3f&ack=t&src-supplier=Avnet, ComponentLink2Description=http://www.infineon.com/dgdl/Infineon-IPP_B_I120P04P4L_03-DS-v01_00-en.pdf?fileId=db3a30432f69f146012f783b3b5a2e3f&ack=t&src-supplier=Avnet+Europe, ComponentLink2URL=http://www.infineon.com/dgdl/Infineon-IPP_B_I120P04P4L_03-DS-v01_00-en.pdf?fileId=db3a30432f69f146012f783b3b5a2e3f&ack=t&src-supplier=Avnet+Europe, ComponentLink3Description=http://www.farnell.com/datasheets/2018448.pdf?src-supplier=Element14, ComponentLink3URL=http://www.farnell.com/datasheets/2018448.pdf?src-supplier=Element14, Drain to Source Voltage (Vdss)=-40V, Element Configuration=Single, Fall Time=57ns, Halogen Free="Halogen Free", Height=4.4mm, Length=10mm, Max Dual Supply Voltage=-40V, Number of Pins=3, Packaging="Tape and Reel", Power Dissipation=136W, Pricing 1="1=3.19000, 10=2.86100, 100=2.34420, 500=2.00360 (USD)", Rds On Max=3.1mR, REACH SVHC="No SVHC", Rise Time=16ns, RoHS=Yes, RoHS Compliant=Yes, Supplier 1=Digi-Key, Turn-Off Delay Time=85ns, Turn-On Delay Time=21ns, Width=9.25mm
R1 R4: library part 0201WMF5102TEE, "51kO 0201 Chip Resistor", Manufacturer="Uni Royal", ComponentLink1Description="New link", ComponentLink1URL=https://www.lcsc.com/product-detail/Chip-span-style-background-color-ff0-Resistor-span-Surface-Mount_UNI-ROYAL-Uniroyal-Elec-0201WMF5102TEE_C473471.html, Manufacturer Part No=0201WMF5102TEE
R2 R5: library part 0201WMF7153TEE, "715kO 0201 Chip Resistor", Manufacturer="Uni Royal", ComponentLink1Description="New link", ComponentLink1URL=https://www.lcsc.com/product-detail/Chip-Resistor-Surface-Mount_UNI-ROYAL-Uniroyal-Elec-0201WMF7153TEE_C620454.html, Manufacturer Part No=0201WMF7153TEE
R3 R6: library part NQ01WMJ0133TEE, "13kO 0201 Chip Resistor", Manufacturer="Uni Royal", ComponentLink1Description="New link", ComponentLink1URL=https://lcsc.com/product-detail/Chip-Resistor-Surface-Mount_UNI-ROYAL-Uniroyal-Elec-NQ01WMJ0133TEE_C965341.html, Manufacturer Part No=NQ01WMJ0133TEE
R8 R12: library part RMCF0603JT220R, "RES 220 OHM 5% 1/10W 0603", Case Code (Imperial)=0603, Case Code (Metric)=1608, Manufacturer="Stackpole Electronics", Max Operating Temperature=155°C, Max Power Dissipation=100mW, Min Operating Temperature=-55°C, Resistor Type="Thick Film", Supplier Part Number 1=RMCF0603JT220RCT-ND, Temperature Coefficient=100ppm/°C, Tolerance=5%, Case/Package=0603, Category="Chip SMD Resistors", ComponentLink1Description=https://datasheet.ciiva.com/26835/getdatasheetpartid-362043-26835658.pdf?src-supplier=Verical, ComponentLink1URL=https://datasheet.ciiva.com/26835/getdatasheetpartid-362043-26835658.pdf?src-supplier=Verical, Construction=Rectangular, Contact Plating=Tin,Matte, Depth=0.8mm, Features="Automotive AEC-Q200", Height=0.022inch, Lead Free="Lead Free", Length=1.55mm, Manufacturer Part Number=RMCF0603JT220R, Military Standard=Not, Mount="Surface Mount", Number of Terminations=2, Packaging="Tape and Reel", Power Rating=100mW, Pricing 1="1=0.10000, 10=0.01500, 100=0.00610, 1000=0.00274, 2500=0.00238 (USD)", Radiation Hardening=No, Resistance=220R, RoHS=Yes, RoHS Compliant=Yes, Series=RMCF, Size Code=0603, Stock 1=108307, Supplier 1=Digi-Key, Width=0.031inch
R13 R15: library part RC1210FR-07560RL, "RES 560 OHM 1% 1/2W 1210", Case Code (Imperial)=1210, Case Code (Metric)=3225, Manufacturer=Yageo, Max Operating Temperature=155°C, Max Power Dissipation=500mW, Min Operating Temperature=-55°C, Resistor Type="Thick Film", Supplier Part Number 1=13-RC1210FR-07560RLCT-ND, Temperature Coefficient=100ppm/°C, Tolerance=1%, Voltage Rating=200V, Case/Package=1210, Category="Chip SMD Resistors", ComponentLink1Description=https://datasheet.ciiva.com/12575/pyu-rc1210-51-rohs-l-4-12575621.pdf?src-supplier=Mouser, ComponentLink1URL=https://datasheet.ciiva.com/12575/pyu-rc1210-51-rohs-l-4-12575621.pdf?src-supplier=Mouser, Construction=Rectangular, Depth=2.6mm, Features="Moisture Resistant", Height=0.024inch, Lead Free="Lead Free", Length=3.1mm, Manufacturer Part Number=RC1210FR-07560RL, Military Standard=Not, Number of Terminations=2, Packaging="Tape and Reel", Power Rating=500mW, Pricing 1="1=0.17000, 10=0.14900, 100=0.05740, 1000=0.02525, 2500=0.02181 (USD)", Resistance=560R, RoHS=Yes, RoHS Compliant=Yes, Series=RC, Size Code=1210, Supplier 1=Digi-Key, Termination=SMD/SMT, Width=2.6mm
R14 R16: library part 0805W8F1002T5E, "±1% 1/8W Thick Film Resistors 150V ±100ppm/? -55?~+155? 10kO 0805 Chip Resistor - Surface Mount ROHS", Manufacturer=UNI-ROYAL, Package=0805, Manufacturer Part No=0805W8F1002T5E
SB1 SB2 SB3 SB4 SB5 SB6 SB7 SB8: "Solder Bridge ON"
U1 U2: "IC REG BOOST ADJ 2A SOT23-5", Case/Package=SOT-23-5, Manufacturer="TI National Semiconductor", Max Input Voltage=14V, Max Operating Temperature=125°C, Max Output Current=1.4A, Max Output Voltage=20V, Min Input Voltage=2.7V, Min Operating Temperature=-40°C, Min Output Voltage=3V, Package Quantity=1000, Quiescent Current=2mA, Supplier Part Number 1=LMR62014XMF/NOPBCT-ND, Switching Frequency=1.6MHz, Category="Power Supply Modules", ComponentLink1Description=https://datasheet.ciiva.com/3231/lmr62014-3231410.pdf?src-supplier=Avnet, ComponentLink1URL=https://datasheet.ciiva.com/3231/lmr62014-3231410.pdf?src-supplier=Avnet, ComponentLink2Description=https://datasheet.ciiva.com/23854/1777788-23854326.pdf?src-supplier=Newark, ComponentLink2URL=https://datasheet.ciiva.com/23854/1777788-23854326.pdf?src-supplier=Newark, ComponentLink3Description=https://datasheet.ciiva.com/4879/snvs735a-74121-4879731.pdf?src-supplier=Mouser, ComponentLink3URL=https://datasheet.ciiva.com/4879/snvs735a-74121-4879731.pdf?src-supplier=Mouser, ComponentLink4Description=https://datasheet.ciiva.com/22669/1716576-22669414.pdf?src-supplier=Element14, ComponentLink4URL=https://datasheet.ciiva.com/22669/1716576-22669414.pdf?src-supplier=Element14, ComponentLink5Description=https://datasheet.ciiva.com/6603/lmr62014-6603804.pdf?src-supplier=Digi-Key, ComponentLink5URL=https://datasheet.ciiva.com/6603/lmr62014-6603804.pdf?src-supplier=Digi-Key, ComponentLink6Description=https://datasheet.ciiva.com/6603/lmr62014-6603807.pdf?src-supplier=Digi-Key, ComponentLink6URL=https://datasheet.ciiva.com/6603/lmr62014-6603807.pdf?src-supplier=Digi-Key, Contact Plating=Tin,Matte, Lead Free="Lead Free", Manufacturer Part Number=LMR62014XMF/NOPB, Mount="Surface Mount", Number of Outputs=1, Number of Pins=5, Output Configuration=Positive, Output Current=1.4A, Output Type=Adjustable, Output Voltage=20V, Packaging="Tape and Reel", Pricing 1="1=0.96000, 10=0.86000, 25=0.81600, 100=0.67040, 250=0.62672, 500=0.55384 (USD)", Radiation Hardening=No, REACH SVHC="No SVHC", RoHS=Yes, Stock 1=5493, Supplier 1=Digi-Key, Synchronous Rectifier=No, Topology=Boost
U3 U4: "Fixed 3.3V~3.3V Positive 1 80V SOT23-3 Linear Voltage Regulators (LDO) ROHS", Manufacturer="Seaward Elec", Manufacturer Part No=C496613, ComponentLink1Description="New link", ComponentLink1URL=https://lcsc.com/product-detail/Linear-Voltage-Regulators-LDO_Seaward-Elec-SE8633X2-HF_C496613.html
U5 U6: "Opto Coupler General Purpose 6 Pin DIP Photo Transistor", Case/Package=SMD/SMT, Collector Emitter Saturation Voltage=500mV, Forward Current=60mA, Forward Voltage=1.5V, Input Current=10mA, Isolation Voltage=7.5kV, Manufacturer="ON Semiconductor / Fairchild", Manufacturer Part Number=4N25S-M, Max Collector Current=50nA, Max Operating Temperature=100°C, Max Output Voltage=30V, Max Power Dissipation=150mW, Min Operating Temperature=-40°C, Package Quantity=1000, Power Dissipation=250mW, Reverse Breakdown Voltage=6V, Additional Feature="UL RECOGNIZED", Category=Optocouplers, Collector Emitter Voltage (VCEO)=500mV, Collector-emitter Voltage-Max=500mV, ComponentLink1Description=https://datasheet.ciiva.com/16746/4n25sm-16746231.pdf?src-supplier=Future+Electronics, ComponentLink1URL=https://datasheet.ciiva.com/16746/4n25sm-16746231.pdf?src-supplier=Future+Electronics, ComponentLink2Description=https://datasheet.ciiva.com/19453/1201795-19453506.pdf?src-supplier=Jameco, ComponentLink2URL=https://datasheet.ciiva.com/19453/1201795-19453506.pdf?src-supplier=Jameco, ComponentLink3Description=https://datasheet.ciiva.com/15118/getdatasheetpartid-60638-15118453.pdf?src-supplier=Verical, ComponentLink3URL=https://datasheet.ciiva.com/15118/getdatasheetpartid-60638-15118453.pdf?src-supplier=Verical, ComponentLink4Description=https://datasheet.ciiva.com/1246/683405-1246957.pdf?src-supplier=Element14, ComponentLink4URL=https://datasheet.ciiva.com/1246/683405-1246957.pdf?src-supplier=Element14, ComponentLink5Description=https://datasheet.ciiva.com/1246/683405-1246958.pdf?src-supplier=Element14, ComponentLink5URL=https://datasheet.ciiva.com/1246/683405-1246958.pdf?src-supplier=Element14, ComponentLink6Description=https://datasheet.ciiva.com/2087/4n25m-2087542.pdf?src-supplier=Digi-Key, ComponentLink6URL=https://datasheet.ciiva.com/2087/4n25m-2087542.pdf?src-supplier=Digi-Key, ComponentLink7Description=https://datasheet.ciiva.com/8084/4n25m-8084950.pdf?src-supplier=Avnet, ComponentLink7URL=https://datasheet.ciiva.com/8084/4n25m-8084950.pdf?src-supplier=Avnet, Contact Plating=Tin,Matte, Element Configuration=Single, Fall Time=2us, Input Type=DC, Isolation Voltage-Max=7.5kV, Lead Free="Lead Free", Max Input Current=60mA, Mount="Surface Mount", Number of Channels=1, Number of Circuits=1, Number of Elements=1, Number of Functions=1, Number of Pins=6, Output Voltage=30V, Packaging=Bulk, Pricing 1="1000=0.21948, 1100=0.21355, 2100=0.20762, 5000=0.20169, 10000=0.19576, 50000=0.18982, 100000=0.18389 (USD)", Radiation Hardening=No, REACH SVHC="No SVHC", Reverse Voltage (DC)=6V, Rise Time=2us, RoHS=Yes, RoHS Compliant=Yes, Series=-, Stock 1=3182, Supplier 1=Avnet, Supplier Part Number 1=4N25SM, Terminal Finish=Tin, Weight=0.81g
U7: "DC5-24V Wireless WIFI LED RGB Controller RGBW Controller IR / RF Remote Control IOS/Android for LED Strip RGB RGBW RGBWW", Manufacturer=Tasmota, Package=Custom, ComponentLink1Description="Supplier Link", ComponentLink1URL=https://tasmota.github.io/docs/devices/MagicHome-with-ESP8285/#, Manufacturer Part No=ESP8285

## Free pads (board coordinates)
  round 115 hole 55 square: MH1(69,1724) MH2(3379,1724) MH3(3379,67) MH4(69,67)

## Via types
v1: diameter 23.62, hole 11.81, Top Layer to Bottom Layer, tented both sides, 33 vias
v2: diameter 62.99, hole 31.5, Top Layer to Bottom Layer, tented both sides, 24 vias

## Nets (pads, with @x,y where several pads share a name; then routed paths per layer and width w, separated by ;. In a path a pad name is that pad's centre, name@x,y a point inside that pad or via, vN(x,y) a via of type N, cw(c..) or ccw(c..) an arc to the next point about the centre after c; other vN are vias at no path point)
12VIN: CF1.1 J1.1 Q1.3 Q2.3 R14.1 R16.1 U7.2 U7.3 | length 1798
  Bottom Layer w50: 1256,344 1256,683.18 2117.43,1544.61 U7.2
  other v2: 787.81,231 1603,231 1668,231
ANODE1: SB1.2 SB5.2 U5.1 | length 319.2
  Top Layer w50: U5.1@1193,802 1276,802 1349,875 SB5.2
ANODE2: SB3.2 SB7.2 U6.1 | length 688
  Top Layer w25: v2(1728,1653) v2@1728,1654
  Bottom Layer w50: v2(1197,1282) 1361.04,1282 1728,1648.96 v2(1728,1653)
BLUE: J6.3 J6.14 U7.6 | length 1790.9
  Top Layer w25: U7.6 2757.21,1407.79 2836.93,1328.07 J6.14 3238.93,1328.07 3318,1249 3318,546 3233.93,461.93 J6.3
BOOST1: C3.1 C4.1 D1.2 J6.6 R2.2 | length 1613.1
  Top Layer w50: v2(2957,700) 2957.93,699.07 J6.6@3141.95,699.07
  Bottom Layer w25: v1(1663,1023) 1722,964 v1(1905,964) 2691,964 2693,964 v2(2957,700)
BOOST2: C7.1 C8.1 D2.2 J6.11 R5.2 | length 1634.2
  Top Layer w15: v1@1663.5,721.5 v1(1664.38,722.38) ; C8.1@1809,802 C8.1@1810,801
  Top Layer w25: v1(2293.36,722.36) 2666.36,722.36 3035.85,1091.85 J6.11
  Bottom Layer w25: v1(1664.38,722.38) v1@2293.34,722.38
  other v1: 1916,623.5 1696,660
CATHODE1: SB2.2 SB6.2 U5.2 | length 705.9
  Top Layer w25: SB6.2 1258,485 1272.64,499.64 1272.64,688.36 1258,703 U5.2
CATHODE2: SB4.2 SB8.2 U6.2 | length 1743.6
  Top Layer w25: v2(998,971) 1008,971 v2@1011.8,967.2 ; SB8.2@1011.8,905.2 SB8.2 ; SB4.2 1486,1306 ; U6.2 U6.2@1784.78,1557.5 ; v2@1844.5,1557.5 v2(1848,1561) 1851,1561 v2@1855,1557
  Top Layer w50: 1486,1306 1791,1306 1855,1370 v2@1855,1557
  Bottom Layer w50: v2(998,971) 1258,971 v2(1848,1561)
FB1: C3.2 R2.1 R3.1 U1.3
FB2: C7.2 R5.1 R6.1 U2.3 | length 0.3
  Top Layer w20: U2.3@1771.42,685 U2.3
FET_OUT1: C1.1 C2.1 C5.1 C6.1 J6.7 J6.10 L1.2 L2.2 Q2.2_4 R1.1 R4.1 U1.5 U2.5 | length 3845.8
  Top Layer w10: v1(1850,622) v1@1850.18,621.82 ; U2.5@1850.18,586.97 U2.5
  Top Layer w12: U1.5@1844.54,959.79 U1.5@1851.03,953.3
  Top Layer w50: 1839.49,913.5 1839.49,885.49 1857.98,867 ; 1857.98,863.39 L1.2 2051.61,864 2178,864 2224,818 2224,557.68 2194.71,528.39 ; L2.2 2194.71,528.39 ; J6.7 3027.11,776.89 ; J6.10 3024.29,1013.11 2978,966.82 2978,826 3027.11,776.89 ; 2194.71,528.39 2572.39,528.39 2820.89,776.89 3027.11,776.89
  Bottom Layer w22: v1(1850,622) 1563,622 1539,646 1539,874 1561,896 v1(1851.03,896) v1@1851.78,896
  Bottom Layer w50: v2(1412,428) 1841,428 ; v2(1915,501) 1842,428 1841,428 ; v2@1915,502 1841,428
FET_OUT2: J6.1 J6.16 Q1.2_4 | length 1741.8
  Top Layer w50: 3051,167 3176.53,292.53 3304.53,292.53 3408,396 3408,1375 3297.45,1485.55 J6.16
GND: C1.2 C2.2 C4.2 C5.2 C6.2 C8.2 CF1.2 J1.2 J1.3 J1.4 J1.5 J6.8 J6.9 R3.2 R6.2 U1.2 U2.2 U5.4 U6.4 U7.1 | length 105.2
  Top Layer w12: v1(1811,580) U2.2
  other v1: 1687.74,537.03 1687.74,564.03 93,735 93,770 93,805 93,840 1659,842 1684,842 3090,896 3125,896 3160,896 3195,896 282,1747 317,1747 352,1747 387,1747 1432,1747 1467,1747 1502,1747 1537,1747 2129,1747 2164,1747 2199,1747 2234,1747
  other v2: 2347,824 2415.25,824 2483.5,824 2551.75,824 2620,824
GREEN: J6.4 J6.13 U7.5 | length 1741.2
  Top Layer w25: U7.5 2660,1656.39 2660,1379.33 2790,1249.33 J6.13 3226.67,1249.33 3283,1193 3283,596 3227.67,540.67 J6.4
NetC9_1: C9.1 R8.1 U3.2
NetC10_1: C10.1 R12.1 U4.2
NetR8_2: R8.2 SB1.1
NetR12_2: R12.2 SB3.1
NetR13_2: R13.2 SB5.1
NetR15_2: R15.2 SB7.1
OPTO_C1: Q1.1 R14.2 U5.5 | length 346.8
  Top Layer w25: 1472,435.51 1472,688.36 1486.64,703 U5.5 ; 1620,425 1627,418
OPTO_C2: Q2.1 R16.2 U6.5 | length 1585.4
  Top Layer w25: U6.5@2132,1558 U6.5
  Bottom Layer w50: v2@944,414 v2(944,418) 944,506 v2(1996,1558)
RECT1_N: BR1.2 C13.2 SB6.1 | length 794.6
  Top Layer w50: v2(788,807) 794,813 794,1325 824.46,1355.46 899.77,1355.46 900.36,1356.05 BR1.2
  Bottom Layer w50: v2(788,658) v2(788,807)
RECT1_P: BR1.1 C13.1 R13.1 | length 650.3
  Top Layer w25: 1202,1664 1231.86,1634.14 ; R13.1@1340.5,1109.5 R13.1
  Top Layer w50: 1231.86,1634.14 1293.86,1634.14 1340.5,1587.5 R13.1@1340.5,1109.5
RECT2_N: BR2.2 SB8.1
RECT2_P: BR2.1 R15.1
RED: J6.5 J6.12 U7.4 | length 1651.1
  Top Layer w50: U7.4 2557.21,1332.79 2719.41,1170.59 J6.12 ; v2@3022.41,619.41 J6.5
  Bottom Layer w50: v2@3022.41,1171.41 3023.5,1170.32 v2(3023.5,620.5)
  other v2: 3022.95,1170.87
SHDN1: R1.2 U1.4 | length 0.2
  Top Layer w12: U1.4@1766.86,959.67 U1.4@1766.98,959.79
SHDN2: R4.2 U2.4
SIG1N: BR1.4 C9.2 C11.1 J2.2 SB2.1 U3.1 | length 1892.9
  Top Layer w50: J2.2@505,1375 BR1.4@682.59,1375 ; BR1.4@689,1375 BR1.4@682.59,1375 ; BR1.4 BR1.4@682.59,1375
  Bottom Layer w50: J2.2@505,1375 J2.2 269,1375 207,1313 207,641.29 260.29,588 v2(880,588)
SIG1P: BR1.3 C11.2 J2.1 U3.3 | length 1858.4
  Top Layer w50: BR1.3 695.64,1543.64 625.43,1473.43 J2.1 347.43,1473.43 281,1407 281,814 360,735 C11.2
SIG2N: BR2.4 C10.2 C12.1 J2.4 SB4.1 U4.1 | length 1527.7
  Top Layer w50: J2.4@505,1197.83 505,879 541.05,842.95 BR2.4
  Bottom Layer w50: J2.4@505,1197.83 718.83,1197.83 949,1428 v2(1413,1428)
SIG2P: BR2.3 C12.2 J2.3 U4.3 | length 1378.1
  Top Layer w50: J2.3@505,1296.26 615.26,1186 BR2.3@699,1186
  Bottom Layer w50: J2.3@505,1296.26 633.26,1296.26 977,1640 v2(1501,1640)
SW1: D1.1 L1.1 U1.1
SW2: D2.1 L2.1 U2.1
WHITE: J6.2 J6.15 U7.7 | length 1867.7
  Top Layer w25: U7.7 2857.21,1447.79 2898.19,1406.81 3275.19,1406.81 3360.5,1321.5 3360.5,477.5 3266.19,383.19 J6.2
pads on no net: J2.MH1 J2.MH2 J6.MP1 J6.MP2 U5.3 U5.6 U6.3 U6.6

## Polygon pours and split planes (outlines as drawn)
GND on Top Layer "GND_L01_P000" (hatched 45Degree grid 20 track 8, remove dead copper, pour order 0): 3412,1754 3412,30 35,30 35,1754
GND on Bottom Layer "GND_L02_P002" (hatched 45Degree grid 20 track 8, remove dead copper, pour order 2): 3412,1754 3412,30 35,30 35,1754

## Other copper
Top Layer:
  rectangle net GND: 140.35,15 525,175.42
  rectangle net GND: 6,463 502,534
  rectangle net GND: 477,396 626,534
  rectangle net FET_OUT1: 1858,469 1952,541
  rectangle net CATHODE2: 1446,1266 1572,1344
  rectangle net GND: 1599,612 1636,868
  rectangle net ANODE2: 1164,1245 1285,1316
  rectangle net BOOST1: 1680,1050 1710,1100
  rectangle net FB1: 1705,1034 1730,1040
  rectangle net BOOST1: 1661,1090 1774,1130
  rectangle net BOOST1: 1648,1001 1695,1130
  rectangle net RECT1_N: 760,464 818,692
  region net CATHODE2: 1883,1597 1748.28,1597 1748.28,1506 1883,1506
  rectangle net GND: 1646,830 1785,894
  rectangle net BOOST2: 1692,792 1829,820
  rectangle net FET_OUT1: 1834,469 1884,635
  rectangle net FET_OUT1: 1008,15 1447,453
  rectangle net GND: 1718,469 1777,523
  region net FET_OUT1: 1846,553 1787,553 1787,469 1846,469
  rectangle net GND: 1520,469 1636,638
  rectangle net FB2: 1720,586 1744,669
  rectangle net GND: 1608,469 1743,575
  rectangle net OPTO_C2: 1981,1506 2169,1597
  rectangle net CATHODE2: 855,885 1035,1006
  rectangle net 12VIN: 542,15 979,283
  rectangle net OPTO_C2: 638,298 977,454
  rectangle net 12VIN: 1458,17 1799,283
  rectangle net OPTO_C1: 1458,298 1797,454
  rectangle net FET_OUT2: 2840,17 3262,329
  rectangle net FET_OUT2: 1822,17 3033,453
  rectangle net BOOST1: 1894,942 1949,984
  rectangle net FB1: 1720.21,1034 1786,1080
  rectangle net GND: 1797,1001 1826,1134
  rectangle net SW1: 1837,1007 2154,1078
  rectangle net SIG2P: 1382,1531 1614,1682
  rectangle net SIG2N: 1379,1354 1575,1499
  rectangle net NetC10_1: 1589.54,1354 1712,1497.85
  rectangle net NetR12_2: 1630,1512 1712,1603
  rectangle net ANODE2: 1629,1620 1811,1684
  rectangle net 12VIN: 2296,1501 2501,1703
  rectangle net GND: 1905,1128 2376,1484
  rectangle net RECT2_N: 855,803 1034,875
  rectangle net SIG1P: 840,703.71 1037,777
  rectangle net SIG1N: 843,514 1004,670
  rectangle net NetC9_1: 1014,514 1109,652
  rectangle net NetR8_2: 1059,667 1105,756
  rectangle net ANODE1: 1059,769 1227,836
  rectangle net NetR13_2: 1385,981 1505,1170
  rectangle net NetR15_2: 1165,1043 1285,1232
  rectangle net RECT2_P: 857,1044 1150,1234
  rectangle net RECT1_N: 856,1327 1269.92,1572.08
  rectangle net RECT1_P: 857,1602 1271,1775
  rectangle net GND: 1646,947 1695,987
  rectangle net FB1: 1705,973 1719.17,1040
  rectangle net GND: 1731,953 1746,1007.05
  rectangle net GND: 1731,1001 1823,1021
  rectangle net GND: 2333,760 2655,978
  rectangle net FET_OUT1: 1796,838 1882.98,985
  rectangle net SW2: 1836,646 1864,712
  rectangle net GND: 2283,760 2500,1484
  rectangle net BOOST2: 1895,558 1947,635
  rectangle net BOOST2: 1687,623 1710,638
  rectangle net BOOST2: 1646,623 1710,820
  rectangle net GND: 1599,858 1746,963
  rectangle net SHDN1: 1757,904 1785,985
  rectangle net GND: 1798,665 1826,754
  rectangle net SHDN2: 1758,534 1777,606
  rectangle net SHDN2: 1771.17,543 1771.63,586.79
  rectangle net FB2: 1720,659 1786,707
  rectangle net SW2: 1842,646 2114,752
  rectangle net SIG1N: 655,1324 727,1408
  rectangle net GND: 3071,826 3219,961
  rectangle net SIG2P: 655,1144.09 727,1226
  rectangle net 12VIN: 535,16 625,386
  pour cut-out: 0,463 0,445 0,175 476,175 476,463
Bottom Layer:
  rectangle net BOOST2: 1899,603 1934,684
  rectangle net BOOST2: 1681,644 1934,684
  rectangle net GND: 2749,86 3145,548
  rectangle net GND: 3071.19,36 3221,960.53
  region net 12VIN: 1796,196 1796,357 484,357 484,196
  rectangle net GND: 257,15 3222,177
  rectangle net GND: 1670,524 1830,600
  rectangle net GND: 2487,15 2760,807
  rectangle net GND: 1567,756 2760,859
  pour cut-out: 0,463 0,445 0,175 476,175 476,463

## Silkscreen, mask and mechanical layers (free items; w line width, h text height)
Top Overlay:
  lines w10: 1676.51,1059 1687.38,1059 ; 1707,912 1763,912 ; 1709,858 1740,889 1750,889 1759,889 ; 1715,829 1746,860 1751.5,860 ; 1845,729 1856,718 ; 1856,756 1856,718 ; 1867,729 1856,718
  text "R" at 2524,1716 h70
  text "G" at 2627,1716 h70
  text "B" at 2730,1716 h70
  text "W" at 2828,1716 h70
  text "VP" at 2418,1714 h70
  text "RED" at 2535.37,1599.65 h80 r270
  text "GREEN" at 2635.54,1599.65 h80 r270
  text "BLUE" at 2734.75,1599.65 h80 r270
  text "WHITE" at 2833,1599.65 h80 r270
  text "VIN" at 2433,1598 h80 r270
Bottom Overlay:
  drawing of 3074 lines, arcs and shapes, not listed
  text "ZERO CARBON FOOTPRINT" at 1451.88,85 h38
Mechanical 2:
  lines w10: 0,181 0,-5 3450,-5 3450,1795 0,1795 0,1345 0,456 ; 2,181 470,181 470,456 3,456

## Dimensions
0,1795 to 0,-5 on Mechanical 1
0,1795 to 3450,1795 on Mechanical 1

## Text inside footprints (layer, text, board x,y; h text height)
J1: Top Overlay "Board Edge" at 83.88,441.8 h23.62 r270
J2: Top Overlay "Board Edge" at 94.12,1541.43 h40 r270